# Altium PCB PCB1.PcbDoc
Units mm, origin at the board's own origin, x right, y up, seen from the top; angles counter-clockwise.
Board outline 100 x 68 mm, 2 copper layers (Top Layer, Bottom Layer); 53 components, 41 nets, 257 pads, 329 vias.
Unrouted connection lines stored in the file: 28.
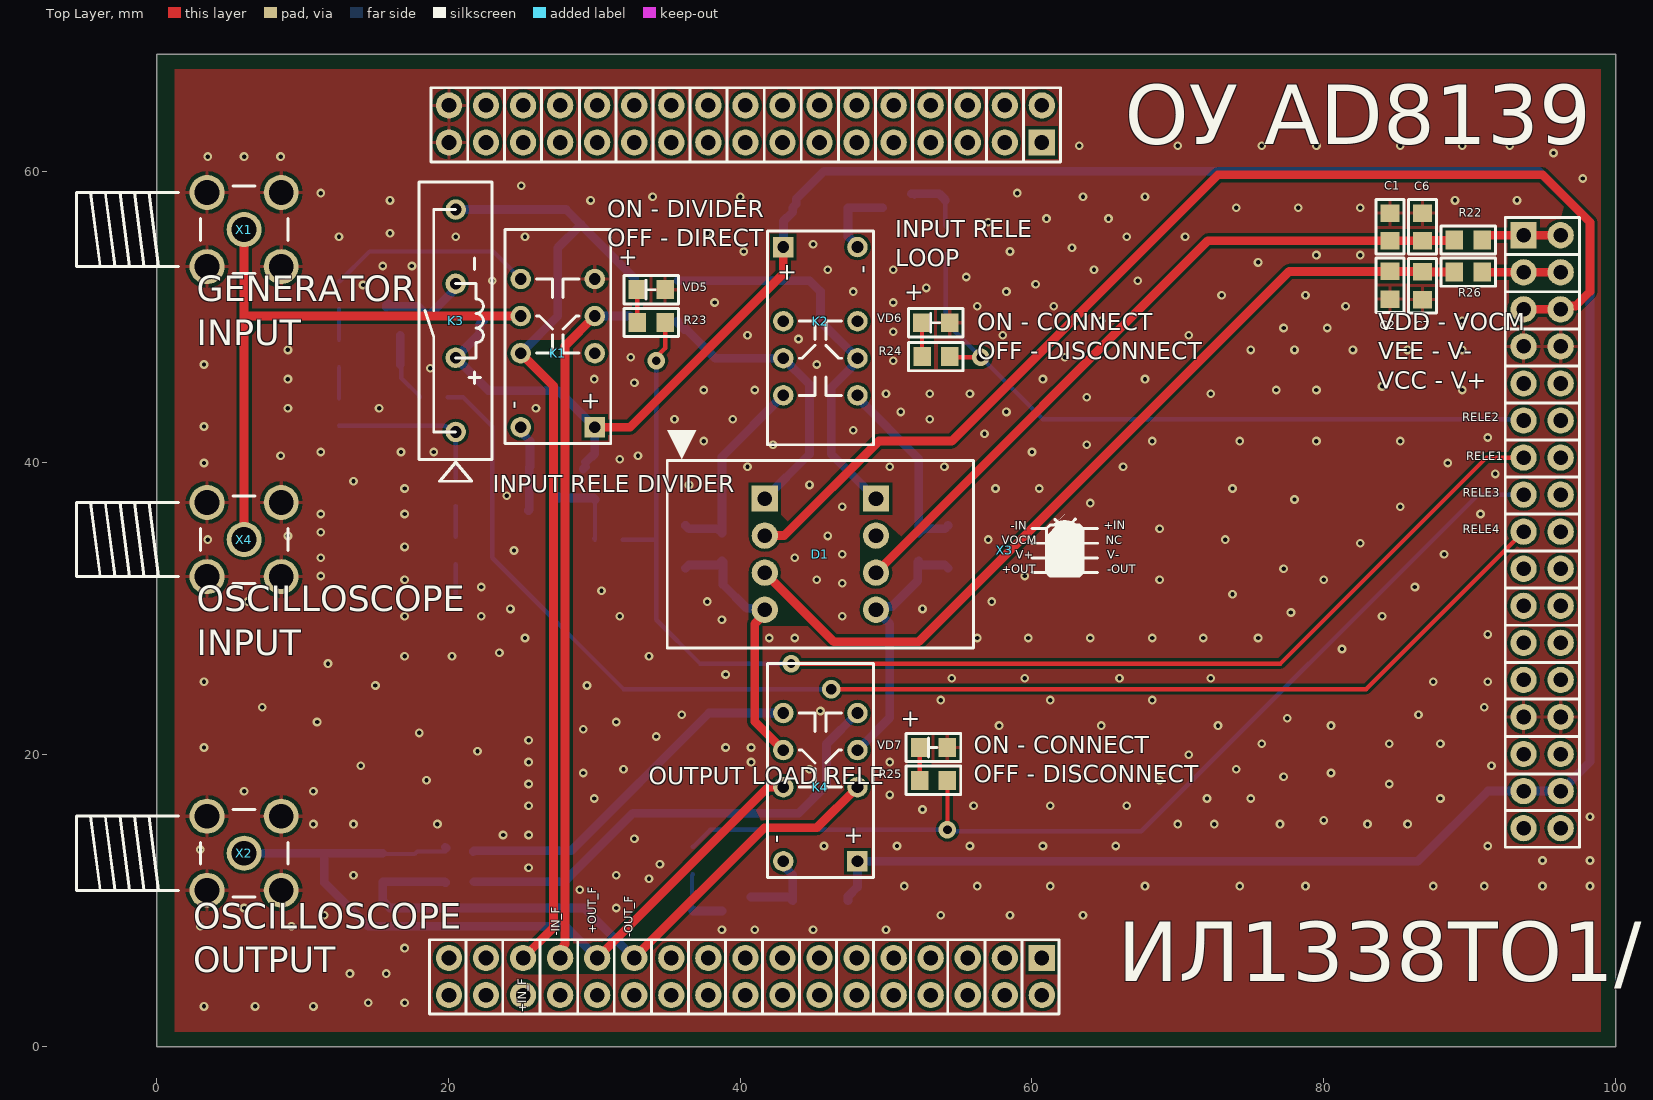
[diagram p0: Top Layer view]
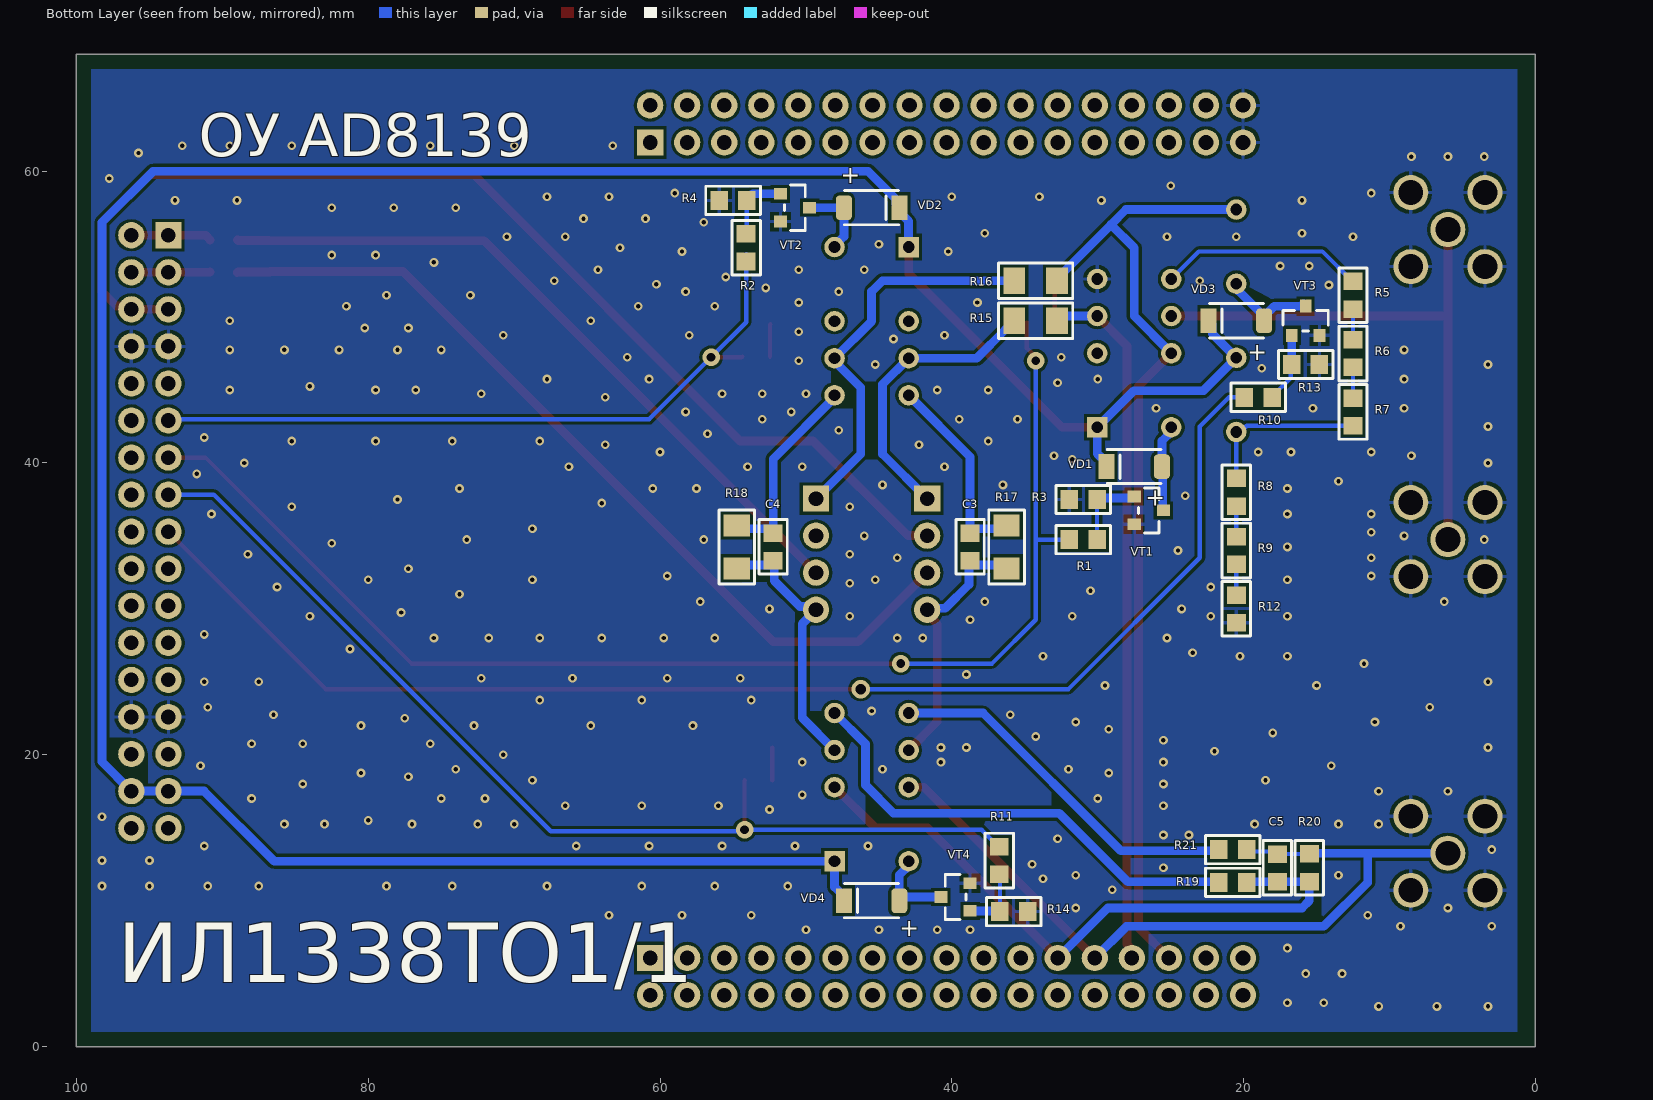
[diagram p1: Bottom Layer view, seen from below]

## Layer stack, top to bottom
Top Solder: solder mask 0.0102, Solder Resist, Dk 3.5
Top Layer: signal copper 0.0356
Dielectric 1: dielectric 0.32, FR-4, Dk 4.8
Bottom Layer: signal copper 0.0356
Bottom Solder: solder mask 0.0102, Solder Resist, Dk 3.5

## Board outline
0,0 100,0 100,68 0,68

## Design rules (kind name [scope] priority, off if disabled: settings)
Clearance [All] p1: gap=0.2 ignorepadtopadclearanceinfootprint=FALSE
ComponentClearance [All] p1: gap=0 collisioncheckmode=3 verticalgap=0 showdistances=FALSE
PolygonConnect [InNet('GND')] p1: thpad.connectstyle=Relief thpad.reliefconductorwidth=0.254 thpad.reliefentries=4 thpad.polygonreliefangle="90 Angle" thpad.airgapwidth=0.254 smdpad.connectstyle=Relief smdpad.reliefconductorwidth=0.254 smdpad.reliefentries=4 smdpad.polygonreliefangle="90 Angle" smdpad.airgapwidth=0.254 via.connectstyle=Direct via.reliefconductorwidth=0.254 via.reliefentries=4 via.polygonreliefangle="90 Angle" via.airgapwidth=0.254
RoutingVias [All] p1: holewidth=0.4 width=0.8 viastyle="Through Hole" minholewidth=0.3 minwidth=0.6 maxholewidth=0.8 maxwidth=1.6
SilkToSilkClearance [All] p1: silktosilkclearance=0
SilkToSolderMaskClearance [IsPad] p1: minsilkscreentomaskgap=0 clearancetoexposedcopper=TRUE
SolderMaskExpansion [All] p1: expansion=0.102 istentingtop=FALSE
Width [All] p1: maxlimit=0.6 minlimit=0.3 preferedwidth=0.3
27 further rules are at their usual default settings.

## Classes and differential pairs
component class "Formula connector": X3

## Components (designator, comment, footprint, x,y, rotation, side; value= is the part's Value field where it differs from the comment)
C1 "0.1uF" 0805 84.544,56.182 r90 top
C2 "0.1uF" 0805 84.544,52.183 r270 top
C3 "0.1uF" 0805 38.75,34.25 r270 bottom
C4 "0.1uF" 0805 52.25,34.25 r270 bottom
C5 "0.1uF" 0805 17.685,12.245 r270 bottom
C6 "0.1uF" 0805 86.768,56.182 r90 top
C7 "0.1uF" 0805 86.768,52.151 r270 top
D1 "AD8139" AD8139 45.5,33.75 r0 top
K1 "V23079A1001B301 TE" V23079A1001B301 27.5,48.75 r90 top
K2 "V23079A1001B301 TE" V23079A1001B301 45.5,48.5 r270 top
K3 "TRR1A05F00" TRR1A05F00 20.5,49.75 r90 top
K4 "V23079A1001B301 TE" V23079A1001B301 45.5,19 r90 top
R1 "4.7k" 0805 31,34.75 r180 bottom
R2 "4.7k" 0805 54.1,54.761 r90 bottom
R3 "20k" 0805 31,37.5 r0 bottom
R4 "20k" 0805 55,58 r0 bottom
R5 "R0805 Yageo" 0805 12.5,51.5 r270 bottom
R6 "R0805 Yageo" 0805 12.5,47.5 r270 bottom
R7 "R0805 Yageo" 0805 12.5,43.5 r270 bottom
R8 "R0805 Yageo" 0805 20.5,38 r90 bottom
R9 "R0805 Yageo" 0805 20.5,34 r90 bottom
R10 "4.7k" 0805 19,44.5 r180 bottom
R11 "4.7k" 0805 36.75,12.75 r270 bottom
R12 "R0805 Yageo" 0805 20.5,30 r90 bottom
R13 "20k" 0805 15.75,46.75 r180 bottom
R14 "20k" 0805 35.75,9.25 r180 bottom
R15 "R1206 Yageo 200 Ohm ±0.1%" 1206 34.25,49.75 r0 bottom
R16 "R1206 Yageo 200 Ohm ±0.1%" 1206 34.25,52.5 r0 bottom
R17 "R1206 Yageo 200 Ohm ±0.1%" 1206 36.25,34.25 r270 bottom
R18 "R1206 Yageo 200 Ohm ±0.1%" 1206 54.75,34.25 r270 bottom
R19 "R0805 Yageo" 0805 20.75,11.25 r180 bottom
R20 "R0805 Yageo" 0805 15.5,12.25 r270 bottom
R21 "R0805 Yageo" 0805 20.75,13.5 r180 bottom
R22 "2.2k" 0805 89.9,55.281 r0 top
R23 "2.2k" 0805 33.904,49.627 r180 top
R24 "2.2k" 0805 53.415,47.295 r180 top
R25 "2.2k" 0805 53.25,18.25 r180 top
R26 "2.2k" 0805 89.9,53.084 r0 top
VD1 "LL4148 NXP" SOD80C 27.5,39.75 r0 bottom
VD2 "LL4148 NXP" SOD80C 45.5,57.5 r180 bottom
VD3 "LL4148 NXP" SOD80C 20.5,49.75 r0 bottom
VD4 "LL4148 NXP" SOD80C 45.5,10 r0 bottom
VD5 "LED(0805)" 0805(LED) 33.904,51.877 r0 top
VD6 "LED(0805)" 0805(LED) 53.413,49.613 r0 top
VD7 "LED(0805)" 0805(LED) 53.25,20.5 r0 top
VT1 "MMBT5551L" SOT-23 26.5,36.75 r270 bottom
VT2 "MMBT5551L" SOT-23 50.75,57.5 r270 bottom
VT3 "MMBT5551L" SOT-23 15.75,49.75 r180 bottom
VT4 "MMBT5551L" SOT-23 39.75,10.25 r90 bottom
X1 "SMA GENERATOR" KLS1-SMA002-B 6,56 r90 top
X2 "SMA OSC" KLS1-SMA002-B 6,13.25 r90 top
X3 "FORMULA" FORMULA 48.5,32.75 r0 top locked
X4 "SMA OSC" KLS1-SMA002-B 6,34.75 r90 top

## Footprints (in the part's own frame and the unit in brackets; to place one, negate y for a bottom-side part, rotate by r counter-clockwise, add the part's x,y. Pads: shape width x height; smd on the part's side, far side on the other; paste and mask are expansions set on the pad)
0805 [mm]
  rect 1.2x1.3 smd: 1(-0.95,0) 2(0.95,0)
  silkscreen extent -1.87,-0.97 1.87,0.97, body extent -1.05,-0.63 0.95,0.63, height 0.55
0805(LED) [mm]
  rect 1.2x1.3 smd: 1(-0.95,0) 2(0.95,0)
  silkscreen extent -1.87,-0.97 1.87,0.97, body extent -1.03,-0.41 1.03,0.5, height 0.85
1206 [mm]
  rect 1.5x1.8 smd: 1(-1.47,0) 2(1.47,0)
  silkscreen extent -2.54,-1.22 2.54,1.22, body extent -1.81,-0.8 1.79,0.8, height 0.55
AD8139 [mm]
  rect 1.8x1.8 hole 1: 1(-3.81,3.81) 8(3.81,3.81)
  round 1.8 hole 1: 2(-3.81,1.27) 3(-3.81,-1.27) 4(-3.81,-3.81) 5(3.81,-3.81) 6(3.81,-1.27) 7(3.81,1.27)
  silkscreen extent -10.5,-6.42 10.5,6.43, body extent -5.06,-5.35 5.06,5.35, height 3
FORMULA [mm]
  rect 1.8x1.8 hole 1: 1(12.18,29.22) VDDF(12.18,-26.68) VEEF(45.2,22.86)
  round 1.8 hole 1: 2(9.64,29.22) 3(7.1,29.22) 4(4.56,29.22) 5(2.02,29.22) 6(-0.52,29.22) 7(-3.06,29.22) 8(-5.6,29.22) 9(-8.14,29.22) 10(-10.68,29.22) 11(-13.22,29.22) 12(-15.76,29.22) 13(-18.3,29.22) 14(-20.84,29.22) 15(-23.38,29.22) 16(-25.92,29.22) 17(12.18,31.76) 18(9.64,31.76) 19(7.1,31.76) 20(4.56,31.76) 21(2.02,31.76) 22(-0.52,31.76) 23(-3.06,31.76) 24(-5.6,31.76) 25(-8.14,31.76) 26(-10.68,31.76) 27(-13.22,31.76) 28(-15.76,31.76) 29(-18.3,31.76) 30(-20.84,31.76) 31(-23.38,31.76) 32(-25.92,31.76) 33(-28.46,-29.22) 34(-25.92,-29.22) 35(-23.38,-29.22) 36(-20.84,-29.22) 37(-18.3,-29.22) 38(-15.76,-29.22) 39(-13.22,-29.22) 40(-10.68,-29.22) 41(-8.14,-29.22) 42(-5.6,-29.22) 43(-3.06,-29.22) 44(-0.52,-29.22) 45(2.02,-29.22) 46(4.56,-29.22) 47(7.1,-29.22) 48(9.64,-29.22) 49(-28.46,-26.68) 50(-25.92,-26.68) 51(-23.38,-26.68) 52(-20.84,-26.68) 53(-18.3,-26.68) 54(-15.76,-26.68) 55(-13.22,-26.68) 56(-10.68,-26.68) 57(-8.14,-26.68) 58(-5.6,-26.68) 59(-3.06,-26.68) 60(-0.52,-26.68) 61(2.02,-26.68) 62(4.56,-26.68) 63(7.1,-26.68) 64(9.64,-26.68) +5V(45.2,-15.24) +5V(47.74,-15.24) +5V_VCCF(45.2,20.32) +5V_VCCS(47.74,20.32) +5V_VDDF(45.2,17.78) +5V_VDDS(47.74,17.78) +12V(45.2,-12.7) +12V(47.74,-12.7) -12V(45.2,-17.78) -12V(47.74,-17.78) GND(-28.46,29.22) GND(-28.46,31.76) GND(45.2,-10.16) GND(45.2,15.24) GND(47.74,-10.16) GND(47.74,15.24) IN-OUT1(47.74,10.16) IN-OUT2(47.74,7.62) IN-OUT3(47.74,5.08) IN-OUT4(47.74,2.54) IN-OUT5(47.74,0) IN-OUT6(47.74,-2.54) IN-OUT7(47.74,-5.08) IN-OUT8(47.74,-7.62) NC(45.2,12.7) NC(47.74,12.7) OUT1(45.2,10.16) OUT2(45.2,7.62) OUT3(45.2,5.08) OUT4(45.2,2.54) OUT5(45.2,0) OUT6(45.2,-2.54) OUT7(45.2,-5.08) OUT8(45.2,-7.62) VDDS(12.18,-29.22) VEES(47.74,22.86)
  silkscreen extent -29.8,-30.51 49.02,32.97, body extent -29.79,-30.4 48.98,32.92, height 3
KLS1-SMA002-B [mm]
  round 2.4 hole 1.7: 1(0,0) 2(-2.54,-2.54) 2(-2.54,2.54) 2(2.54,-2.54) 2(2.54,2.54)
  silkscreen extent -3,-3 3,11.49, body extent -3.5,-3.5 3.5,11.65, height 10
SOD80C [mm]
  rrect50% 1.1x1.7 smd: 1(-1.9,0)
  rect 1.1x1.7 smd: 2(1.9,0)
  silkscreen extent -1.85,-1.17 1.85,1.17, body extent -1.9,-0.8 1.8,0.8, height 1.55
SOT-23 [mm]
  rect 0.8x0.9 smd: 1(-0.95,-1) 1(-0.95,-1) 2(0.95,-1) 2(0.95,-1) 3(0,1) 3(0,1)
  silkscreen extent -1.55,-0.72 1.55,0.7, body extent -1.5,-1.25 1.5,1.25, height 1.05
TRR1A05F00 [mm]
  round 1.4 hole 0.8: 1(-7.62,0) 3(-2.54,0) 5(2.54,0) 7(7.62,0)
  silkscreen extent -11,-2.5 9.5,2.5, body extent -9.47,-2.64 9.53,2.39, height 7.64
V23079A1001B301 [mm]
  rect 1.4x1.4 hole 0.8: 1(-6.3,-2.54)
  round 1.4 hole 0.8: 3(-1.22,-2.54) 4(1.32,-2.54) 5(3.86,-2.54) 8(3.86,2.54) 9(1.32,2.54) 10(-1.22,2.54) 12(-6.3,2.54)
  silkscreen extent -7.4,-3.63 7.25,3.63, body extent -7.25,-3.6 7.25,3.6, height 9.4

## Part data
C1 C2 C3 C4 C5 C6 C7: library part C0805, ComponentHeigt=1.3, Firme=AVX, KIND=Конденсатор, Leadform=SMD, Packaging=0805
R1 R2 R3 R4 R10 R11 R13 R14 R22 R23 R24 R25 R26: library part "R0805 Yageo", ComponentHeigt=0.6, Firme=Yageo, KIND=Резистор, Leadform=SMD, Packaging=0805
R15 R16 R17 R18: library part "R1206 Yageo", ComponentHeigt=0.6, Firme=Yageo, KIND=Резистор, Leadform=SMD, Packaging=0805
X1 X2 X4: library part KLS1-SMA002-B, ComponentHeigt=5.5, Name=Вилка, Specification="Вилка PLD2-2 *", Typ=PLD2-2
R5 R6 R7 R8 R9 R12 R19 R20 R21: ComponentHeigt=0.6, Firme=Yageo, KIND=Резистор, Leadform=SMD, Packaging=0805
VD1 VD2 VD3 VD4: Component Link=http://www.nxp.com, ComponentHeigt=1.6, Firme=NXP, KIND="Диод LL4148 NXP", Leadform=SMD, NN=24009301, Packaging=SOD-80C
VD5 VD6 VD7: ComponentHeigt=0.75, Firme=Kingbright, KIND="Светодиод L-1154GD Kingbright", Leadform="в отверстия", NN=24003000
VT1 VT2 VT3 VT4: ComponentHeigt=1.1, Firme=ONS, KIND="Транзистор MMBT5551L*G ONS", Leadform=SMD, NN=24007468, Packaging=SOT-23

## Via types
v1: diameter 0.6, hole 0.3, Top Layer to Bottom Layer, tented both sides, 324 vias
v2: diameter 1.2, hole 0.6, Top Layer to Bottom Layer, tented both sides, 4 vias
v3: diameter 1.27, hole 0.711, Top Layer to Bottom Layer, tented both sides, 1 vias

## Nets (pads, with @x,y where several pads share a name; then routed paths per layer and width w, separated by ;. In a path a pad name is that pad's centre, name@x,y a point inside that pad or via, vN(x,y) a via of type N, cw(c..) or ccw(c..) an arc to the next point about the centre after c; other vN are vias at no path point)
+5V_CONST: K1.1 K2.1 K3.3 K4.1 VD1.2 VD2.2 VD3.2 VD4.2 X3.+5V | length 190.1
  Top Layer w0.6: K1.1 32.45,42.45 42.96,52.96 K2.1
  Bottom Layer w0.6: VD3.2 22.15,49.5 22.15,48.86 K3.3 22.757,44.953 27.537,44.953 K1.1 30.04,40.626 29.864,40.45 29.8,40.45 VD1.2@29.4,40.05 ; VD1.2@29.241,39.591 VD1.2 ; K2.1@42.964,54.894 42.964,56.564 43.6,57.2 VD2.2 43.85,57.75 43.85,58.1 45.75,60 94.75,60 98.25,56.5 98.25,19.52 96.24,17.51 93.7,17.51 91.26,17.51 86.45,12.7 K4.1@48.044,12.7 ; VD4.2 47.4,10.3 48.044,10.944 K4.1@48.044,12.7 ; K4.1 K4.1@48.044,12.7
+5V_VCC: R26.2 X3.+5V_VCCF X3.+5V_VCCS | length 5.4
  Top Layer w0.6: R26.2 90.857,53.077 93.693,53.077 X3.+5V_VCCF X3.+5V_VCCS
+5V_VEE: R22.2 X3.VEEF X3.VEES | length 5.5
  Top Layer w0.6: R22.2 90.85,55.31 91.15,55.61 X3.VEES
+IN: K1.10 K3.7 R16.1 X3.51 | length 68.2
  Top Layer w0.6: K1.10 27.2,45.29 27.2,8.15 X3.51
  Bottom Layer w0.6: K3.7 28.06,57.37 29.09,56.34 ; K1.10 27.5,50.07 27.5,54.75 29.09,56.34 ; R16.1 32.78,52.65 29.09,56.34
+IN_OP: D1.8 K2.9 R16.2 | length 27.3
  Bottom Layer w0.6: R16.2 44.75,52.5 45.5,51.75 45.5,49.72 K2.9 48.04,46.964 46.25,45.174 46.25,40.62 D1.8
+IN_SMA: K1.9 X1.1 X4.1 | length 40.3
  Top Layer w0.6: X4.1@6,34.625 X1.1 ; 6,50.07 K1.9
+OUT: C3.2 D1.4 K4.9 R17.2 | length 18.7
  Top Layer w0.6: D1.4 41.69,29.679 41,28.989 41,22.28 K4.9
  Bottom Layer w0.6: R17.2 36.47,33 38.45,33 C3.2 38.824,33.226 38.824,31.676 40.452,30.048 41.582,30.048 D1.4
+OUT_F: C5.1 K4.10 R20.1 R21.2 X2.1 X3.53 | length 54.5
  Top Layer w0.6: X3.53 41.904,17.774 42.954,17.774 K4.10
  Bottom Layer w0.3: R20.1@15.5,13.25 R20.1 C5.1@17.685,13.2 ; C5.1 17.859,13.368 R21.2@19.806,13.368
  Bottom Layer w0.6: X2.1 11.5,13.25 ; R20.1@15.5,13.25 11.5,13.25 ; R21.2@19.78,13.668 R21.2@19.83,13.618 ; X3.53 28.02,8.25 14.5,8.25 11.5,11.25 11.5,13.25
-IN: K1.4 R15.1 X3.52 | length 48
  Top Layer w0.6: X3.52@27.632,6.098 27.89,6.355 27.89,6.911 28,7.021 28,48.03 K1.4
  Bottom Layer w0.6: X3.52 X3.52@27.75,6.16 ; K1.4 32.46,50.07 R15.1
-IN_OP: D1.1 K2.4 R15.2 | length 20.2
  Bottom Layer w0.6: R15.2@35.645,49.675 R15.2 35.72,49.6 36.17,49.15 36.32,49.15 38.29,47.18 K2.4 44.75,45.39 44.75,40.62 D1.1 ; K2.4@42.635,47.105 K2.4@42.71,47.18
-OUT: C4.2 D1.5 K4.4 R18.2 | length 18.1
  Bottom Layer w0.6: K4.4 50.25,22.53 50.25,28.989 49.31,29.929 D1.5 49.54,30.17 50.42,30.17 52.176,31.926 52.176,33.226 C4.2 ; C4.2@52.25,33 54.03,33 R18.2@54.25,32.78
-OUT_F: C5.2 K4.3 R19.2 R20.2 X3.54 | length 44.7
  Top Layer w0.6: X3.54@32.75,6.08 41.67,15 45.26,15 K4.3
  Bottom Layer w0.6: C5.2 19.755,11.295 R19.2 ; C5.2@17.75,11.3 R20.2 15.5,10 16,9.5 29.31,9.5 X3.54 X3.54@32.75,6.08
GND: C1.2 C2.2 C6.2 C7.2 K1.5 R3.2 R4.2 R12.1 R13.2 R14.2 VD5.2 VD6.2 VD7.2 VT1.2 VT2.2 VT3.2 VT4.2 X1.2 X2.2 X3.GND X4.2
  other v1: 3.25,2.75 6.75,2.75 10.75,2.75 14.5,3 17,3 13.25,5 15.75,5 17,6.75 38.75,8 41,8 45,8 50,8 3,8.25 9.25,8.25 11.5,9 53.75,9 58.5,9 63.5,9 6,9.5 31.5,9.5 29,10.75 51.25,11 56.25,11 61.25,11 67.75,11 74.25,11 78.75,11 87.5,11 91,11 95,11 98.25,11 33.75,11.5 13.5,11.75 31.5,11.75 25.5,12.25 34.5,12.5 95,12.75 98.25,12.75 3,13.5 45.75,13.75 50.75,13.75 55.75,13.75 60.75,13.75 65.75,13.75 91.25,13.75 32.75,14.25 23.75,14.5 25.5,14.5 10.75,15.25 13.5,15.25 19.25,15.25 70,15.25 72.5,15.25 77,15.25 83,15.25 85.75,15.25 80,15.5 98.25,15.75 52.5,16.25 25.5,16.5 56,16.5 61.25,16.5 66.5,16.5 30,17 72,17 75,17 88,17 50.25,17.25 6,17.5 10.75,17.5 25.5,18 84.5,18 18.5,18.25 68.75,18.25 77.25,18.5 29.25,18.75 80.5,18.75 32,19 44.75,19 74,19 14,19.25 91.5,19.25 25.5,19.5 40.75,19.5 50.25,19.5 70.75,20 22,20.25 3.25,20.5 39,20.5 40.75,20.5 75.75,20.75 84.5,20.75 88,20.75 25.5,21 34.25,21.25 18,21.5 29.25,21.75 57.75,22 64.75,22 72.75,22 80.5,22 11,22.25 31.5,22.25 77.5,22.5 36,22.75 86.5,22.75 45.5,23 7.25,23.25 91,23.25 53.75,23.75 61.25,23.75 68.25,23.75 15,24.75 29.5,24.75 3.25,25 87.5,25 91.25,25 54.5,25.25 59.5,25.25 66,25.25 72.25,25.25 39,25.5 11.75,26.25 17,26.75 20.25,26.75 33.75,26.75 23.5,27 81.25,27.25 25.25,28 42,28 43.75,28 56.25,28 59.75,28 64,28 68.25,28 71.75,28 75.5,28 91.25,28.25 38.75,29.25 17,29.5 22.25,29.5 31.75,29.5 47,29.5 84,29.5 77.75,29.75 24.25,30 52.5,30 6.25,30.5 37.75,30.5 57.25,30.5 73.75,31 30.5,31.25 22.25,31.5 86.25,31.5 47,31.75 17,32 45.25,32 68.75,32 80,32 11.25,32.25 59.5,32.25 77.25,32.75 11.25,33.5 43.75,33.5 47,33.75 88.25,33.75 24.5,34 17,34.25 82.5,34.5 3.5,34.75 57,34.75 73.25,34.75 9,35 46,35 11.25,35.25 68.75,35.5 11.25,36.5 17,36.5 90.75,36.5 47,37 85.25,37 64,37.25 78,37.5 24,37.75 17,38.25 57.5,38.25 60.5,38.25 73.75,38.25 36.5,38.5 44.75,38.5 13.5,38.75 91.75,39.25 40.5,39.75 50.25,39.75 54,39.75 66.25,39.75 3.25,40 88.5,40 31.75,40.25 8.5,40.5 33,40.5 11.25,40.75 16.75,40.75 19,40.75 60,40.75 42.25,41.25 63.75,41.25 37.5,41.5 68.25,41.5 74.25,41.5 79.5,41.5 85.25,41.5 91.25,41.75 56.75,42 47.75,42.25 3.25,42.5 35.5,43 39.5,43 53,43 51,43.5 58.25,43.5 9,43.75 15.25,43.75 26,43.75 63.75,44.5 50,44.75 53,44.75 55.75,44.75 72.25,44.75 37.5,45 41,45 76.75,45 79.5,45 89.5,45 84,45.25 32.75,45.5 9,45.75 30,45.75 60.75,45.75 67.75,45.75 18.75,46.5 3.25,46.75 45.25,46.75 50.5,47 32.5,47.25 62.25,47.25 9,47.75 75,47.75 78,47.75 82,47.75 85.75,47.75 89.5,47.75 44,48.5 40.5,48.75 58,48.75 70.75,48.75 50.5,49 77.25,49.25 80.25,49.25 64.75,49.75 89.5,49.75 56.25,50.75 61.5,50.75 81.5,50.75 38.25,51 50.5,51 73,51.5 78.75,51.5 47.75,51.75 58.25,51.75 52.75,52 14.155,52.199 60.25,52.25 23,52.5 67.25,52.5 55.5,52.75 46,53.25 50.5,53.25 64.25,53.25 15.5,53.5 17.5,53.5 75.5,53.75 79.5,54.25 82.5,54.25 40.25,54.5 58.5,54.5 62.75,54.75 45,55 12.5,55.5 20.5,55.5 25.25,55.5 66.5,55.5 70.5,55.5 16,55.75 37.75,55.75 57,56.5 61,56.75 65.25,56.75 74,57.5 78.25,57.5 82.5,57.5 16,58 29.75,58 89,58 93.25,58 34,58.25 40,58.25 63.5,58.25 67.75,58.25 11.25,58.5 59,58.5 25,59 97.75,59.5 3.5,61 6,61 8.5,61 95.75,61.25 63.25,61.75 70,61.75 75.75,61.75 79.5,61.75 85.25,61.75 89.5,61.75 92.75,61.75
NetC3_1: C3.1 K2.5 R17.1 | length 13.9
  Bottom Layer w0.6: R17.1 36.47,35.5 38.45,35.5 C3.1 38.75,40.43 K2.5
NetC4_1: C4.1 K2.8 R18.1 | length 13.4
  Bottom Layer w0.6: K2.8@47.964,44.564 52.25,40.278 52.25,35.5 C4.1 52.55,35.5 54.03,35.5 R18.1@54.25,35.72
NetK1_8: K1.8 R5.1 | length 14.1
  Bottom Layer w0.3: R5.1 12.55,52.45 14.6,54.5 23.07,54.5 K1.8
NetK1_12: K1.12 VD1.1 VT1.3 | length 6
  Bottom Layer w0.6: K1.12 24.96,42.152 25.6,41.512 VD1.1 25.55,39.7 25.55,36.8 VT1.3@25.5,36.75
NetK2_12: K2.12 VD2.1 VT2.3 | length 5.3
  Bottom Layer w0.6: K2.12 48.04,54.886 47.4,55.526 VD2.1 VT2.3@49.75,57.5
NetK3_1: K3.1 R7.2 R8.2 | length 11.4
  Bottom Layer w0.3: R7.2 19.782,42.55 20.202,42.13 K3.1 R8.2
NetK3_5: K3.5 VD3.1 VT3.3 | length 6.5
  Bottom Layer w0.6: VT3.3@15.75,50.7 15.75,50.8 15.85,50.9 VT3.3@15.9,50.9 ; VT3.3@15.75,50.75 17.9,50.75 18.6,50.05 20.347,51.797 20.347,52.137 K3.5
NetK4_5: K4.5 R19.1 | length 32.7
  Bottom Layer w0.6: R19.1@21.749,11.3 27.941,11.3 32.641,16 44,16 45.91,17.91 45.91,20.73 K4.5
NetK4_8: K4.8 R21.1 | length 25.2
  Bottom Layer w0.6: R21.1@21.706,13.368 21.756,13.418 28.418,13.418 37.86,22.86 K4.8
NetK4_12: K4.12 VD4.1 VT4.3 | length 5.9
  Bottom Layer w0.6: VT4.3@40.75,10.25 43.35,10.25 VD4.1 43.6,11.762 42.96,12.402 K4.12
NetR1_2: R1.2 R3.1 VT1.1 | length 5.5
  Bottom Layer w0.3: R1.2@30,34.8 R1.2 R3.1
  Bottom Layer w0.6: VT1.1@27.5,37.7 27.6,37.6 29.95,37.6 R3.1
NetR2_2: R2.2 R4.1 VT2.1 | length 4.6
  Bottom Layer w0.3: VT2.1@51.75,58.45 VT2.1@51.95,58.25 ; R4.1 54.05,56.261 R2.2@54.1,56.211
  Bottom Layer w0.6: VT2.1@51.75,58.45 53.65,58.45 54.05,58.05 R4.1
NetR5_2: R5.2 R6.1 | length 2.1
  Bottom Layer w0.3: R6.1 R5.2
NetR6_2: R6.2 R7.1 | length 2.1
  Bottom Layer w0.3: R7.1 R6.2
NetR8_1: R8.1 R9.2 | length 2.1
  Bottom Layer w0.3: R9.2 R8.1
NetR9_1: R9.1 R12.2 | length 2.1
  Bottom Layer w0.3: R12.2 R9.1
NetR10_2: R10.2 R13.1 VT3.1 | length 4.8
  Bottom Layer w0.3: R13.1 16.774,46.676 16.774,45.826 18.05,44.55 R10.2
  Bottom Layer w0.6: R13.1 VT3.1@16.7,48.75
NetR11_2: R11.2 R14.1 VT4.1 | length 4.6
  Bottom Layer w0.3: R14.1@36.75,9.3 R14.1 36.7,11.75 R11.2
  Bottom Layer w0.6: R14.1@36.75,9.3 VT4.1@38.75,9.3
NetR23_2: R23.2 VD5.1 | length 2.2
  Top Layer w0.3: R23.2 VD5.1
NetR24_2: R24.2 VD6.1 | length 2.2
  Top Layer w0.3: VD6.1@52.45,49.5 52.465,49.485 R24.2
NetR25_2: R25.2 VD7.1 | length 2.2
  Top Layer w0.3: R25.2 VD7.1
RELE1: R1.1 R23.1 X3.OUT2 | length 89.5
  Top Layer w0.3: v2(34.25,47) 34.25,47.262 34.854,47.866 R23.1 ; v2(43.5,26.25) 77.04,26.25 91.16,40.37 X3.OUT2
  Bottom Layer w0.3: R1.1 34.25,34.75 ; v2(34.25,47) 34.25,34.75 ; v2(43.5,26.25) 37.25,26.25 34.25,29.25 34.25,34.75
RELE2: R2.1 R24.1 X3.OUT1 | length 49.2
  Top Layer w0.3: R24.1 54.41,47.25 v2(56.5,47.25)
  Bottom Layer w0.3: R2.1@54.1,54.311 54.1,49.65 v2(56.5,47.25) 60.75,43 X3.OUT1@93.7,43
RELE3: R11.1 R25.1 X3.OUT3 | length 70.4
  Top Layer w0.3: R25.1 54.211,18.239 v2(54.211,14.862)
  Bottom Layer w0.3: R11.1 36.8,13.7 37.962,14.862 v2(54.211,14.862) 54.323,14.75 67.5,14.75 90.58,37.83 X3.OUT3
RELE4: R10.1 X3.OUT4 | length 91.8
  Top Layer w0.3: v3(46.25,24.5) 82.91,24.5 X3.OUT4
  Bottom Layer w0.3: R10.1 21,44.5 23,42.5 23,33.5 32,24.5 v3(46.25,24.5)
V+: C2.1 C7.1 D1.3 R26.1 | length 59.8
  Top Layer w0.6: D1.3 46.42,27.75 52.25,27.75 77.633,53.133 C2.1 84.56,53.117 86.752,53.117 C7.1 86.777,53.093 88.942,53.093 R26.1 R26.1@88.975,53.059
V-: C1.1 C6.1 D1.6 R22.1 | length 49.1
  Top Layer w0.6: D1.6 72.062,55.232 C1.1 C6.1 86.793,55.257 88.926,55.257 R22.1 R22.1@88.975,55.306
VOCM: D1.2 X3.+5V_VDDF X3.+5V_VDDS | length 78
  Top Layer w0.6: D1.2 41.698,35.028 43.028,35.028 49.5,41.5 54.5,41.5 72.75,59.75 95,59.75 98.25,56.5 98.25,51.75 97.26,50.76 96.47,50.76 X3.+5V_VDDS 95.68,50.53 X3.+5V_VDDF
pads on no net: D1.7 K1.3 K2.3 K2.10 X3.1 X3.2 X3.3 X3.4 X3.5 X3.6 X3.7 X3.8 X3.9 X3.10 X3.11 X3.12 X3.13 X3.14 X3.15 X3.16 X3.17 X3.18 X3.19 X3.20 X3.21 X3.22 X3.23 X3.24 X3.25 X3.26 X3.27 X3.28 X3.29 X3.30 X3.31 X3.32 X3.33 X3.34 X3.35 X3.36 X3.37 X3.38 X3.39 X3.40 X3.41 X3.42 X3.43 X3.44 X3.45 X3.46 X3.47 X3.48 X3.49 X3.50 X3.55 X3.56 X3.57 X3.58 X3.59 X3.60 X3.61 X3.62 X3.63 X3.64 X3.+12V X3.-12V X3.IN-OUT1 X3.IN-OUT2 X3.IN-OUT3 X3.IN-OUT4 X3.IN-OUT5 X3.IN-OUT6 X3.IN-OUT7 X3.IN-OUT8 X3.NC X3.OUT5 X3.OUT6 X3.OUT7 X3.OUT8 X3.VDDF X3.VDDS

## Polygon pours and split planes (outlines as drawn)
GND on Top Layer "NONET_L-01_P-001" (solid, remove dead copper, pour order 0): 1.25,67 1.25,1 99,1 99,67
GND on Bottom Layer "NONET_L-01_P-001" (solid, remove dead copper, pour order 1): 1.25,67 1.25,1 99,1 99,67

## Other copper
Top Layer:
  pour cut-out: 41.67,15 40.75,15 40.75,16.75
  pour cut-out: 33.754,50.477 33.754,48.777 34.054,48.777 34.054,50.477
  pour cut-out: 24.725,48.407 28,48.407 28,46.75
  pour cut-out: 55.165,46.445 56.5,46.445 56.5,46.443
  pour cut-out: 55.165,48.145 55.165,48.057 56.5,48.057
  pour cut-out: 92.718,52.567 92.718,50.53 93.7,50.53
  pour cut-out: 92.6,54.51 92.6,53.07 93.7,53.07 93.7,55.61
  pour cut-out: 96.24,56.719 96.24,51 96.625,51 96.625,58.125
  pour cut-out: 83.694,56.032 83.694,54.432 87.618,54.432 87.618,56.032
  pour cut-out: 83.694,52.333 83.694,53.901 87.618,53.901 87.618,52.301
  pour cut-out: 89.75,53.934 89.75,52.234 90.05,52.234 90.05,53.934
  pour cut-out: 89.75,56.131 89.75,54.431 90.05,54.431 90.05,56.131
  pour cut-out: 40.581,32.48 40.581,28.831 45.942,28.831
  pour cut-out: 50.095,35.805 50.095,34.5 51.5,34.5
  pour cut-out: 48.238,35.307 48.238,32.48 49.31,32.48
  pour cut-out: 42.5,36.75 42.5,35.5 43.75,35.5
  pour cut-out: 40.59,37.143 40.59,35.028 42.226,35.028
  pour cut-out: 6.5,48.75 6.5,49.525 7.215,49.525
  pour cut-out: 53.263,50.463 53.263,46.445 51.663,46.445 51.663,50.463
  pour cut-out: 53.1,21.35 53.1,18.25 52.3,18.25
  pour cut-out: 51.5,20.448 51.5,18.75 52.443,18.75
  pour cut-out: 53.1,19.1 53.1,17.4 53.4,17.4 53.4,19.1
  pour cut-out: 30.71,7.049 32.75,7.049 32.75,6.08
  pour cut-out: 28.471,6.826 28.471,7.049 29.69,7.049
  pour cut-out: 27.775,4.976 32.75,4.976 32.75,6.08
  pour cut-out: 25.12,4.961 27.775,4.961 27.775,6.185
Bottom Layer:
  pour cut-out: 18.095,51.221 19.623,51.221 19.623,52.055
  pour cut-out: 45.91,17.91 45.91,14.75 44.25,14.75
  pour cut-out: 37.5,16 37.962,16 37.962,14.862
  pour cut-out: 33.139,18.139 33.139,15.5 31.75,15.5
  pour cut-out: 30.85,35.6 31.15,35.6 31.15,33.9 30.85,33.9
  pour cut-out: 19.65,34.15 21.35,34.15 21.35,33.85 19.65,33.85
  pour cut-out: 19.65,38.15 21.35,38.15 21.35,37.85 19.65,37.85
  pour cut-out: 18.85,45.35 19.15,45.35 19.15,43.65 18.85,43.65
  pour cut-out: 11.65,43.65 13.35,43.65 13.35,43.35 11.65,43.35
  pour cut-out: 11.65,47.65 13.35,47.65 13.35,47.35 11.65,47.35
  pour cut-out: 11.65,51.65 13.35,51.65 13.35,51.35 11.65,51.35
  pour cut-out: 37.9,34.4 39.6,34.4 39.6,34.1 37.9,34.1
  pour cut-out: 50.721,29.184 50.721,30.17 49.54,30.17
  pour cut-out: 27.66,4.961 30.2,4.961 30.2,6.07
  pour cut-out: 26.551,6.07 26.551,8.25 28.02,8.25
  pour cut-out: 96.24,21.159 98.25,21.159 98.25,19.52
  pour cut-out: 95.131,20.05 95.131,17.51 96.24,17.51
  pour cut-out: 16.35,10.943 16.35,10.495 16.835,10.495 16.835,10.943
  pour cut-out: 16.35,14 16.35,13.557 16.835,13.557 16.835,13.995
  pour cut-out: 16.35,14 16.35,13.995 16.35,13.557
  pour cut-out: 18.182,13.725 19,13.725 19,14.35
  pour cut-out: 19,10.4 19,10.495 18.535,10.495
  pour cut-out: 20.6,10.4 20.6,12.1 20.9,12.1 20.9,10.4
  pour cut-out: 20.6,14.35 20.6,12.74 20.9,12.74 20.9,14.35
  pour cut-out: 14.65,12.74 22.5,12.74 22.5,12.1 14.65,12.1
  pour cut-out: 30.2,4.961 32.74,4.961 32.74,6.07
  pour cut-out: 14.65,10.97 14.65,8.25 15.98,8.25
  pour cut-out: 35.9,12.9 35.9,12.6 37.6,12.6 37.6,12.9
  pour cut-out: 50.416,22.991 48.04,22.991 48.04,22.279
  pour cut-out: 46.68,21.5 47.398,21.5 47.398,19.678
  pour cut-out: 27.75,13.25 27.75,11.5 28.625,11.5
  pour cut-out: 53.65,33.51 53.1,33.51 53.1,34.99 53.65,34.99
  pour cut-out: 54.44,31.83 52.25,31.83 52.25,33.66
  pour cut-out: 51.4,34.4 53.1,34.4 53.1,34.1 51.4,34.1
  pour cut-out: 48.275,46.543 48.275,43.75 46.333,43.75
  pour cut-out: 54.95,56.511 54.764,56.511 54.764,57.701
  pour cut-out: 54.85,57.15 53.25,57.15 53.25,56.511 54.678,56.511
  pour cut-out: 53.25,57.15 53.25,53.011 54.95,53.011 54.95,56.511 54.407,56.511
  pour cut-out: 44.551,45.585 46.033,45.585 46.033,45.472
  pour cut-out: 45.11,40.26 46,40.26 46,41

## Silkscreen, mask and mechanical layers (free items; w line width, h text height)
Top Overlay:
  region: 61.5,35.75 cw(c62.104,35.146) 62.104,36 62.396,36 cw(c62.396,35.146) 63,35.75
  region: 35,42.25 37,42.25 36,40.25
  region: 35,42.25 35.75,42.25 36.5,42.25
  region: 61.5,35.75 62.25,36.5
  region: 61,32.5 61,35 61.75,35.75 63.25,35.75 63.5,35.5 63.5,32.5 63.25,32.25 61.25,32.25
  lines w0.2: 60,32.5 61,32.5 ; 60,33.5 61,33.5 ; 60,34.5 61,34.5 ; 60,35.5 61,35.5 ; 61.5,35.75 cw(c62.25,34.75) 63,35.75 ; 61.57,36.143 61.767,35.947 ; 62.785,35.958 62.999,36.172 ; 63.5,33.5 64.5,33.5 ; 63.5,34.5 64.5,34.5 ; 64.5,32.5 63.5,32.5 ; 64.5,35.5 63.5,35.5 ; 61,32.5 61,35.5 ; 61,32.5 61.063,32.438 61.188,32.313 61.25,32.25 63.25,32.25 63.5,32.5 ; 61,35.5 61.25,35.75 63.25,35.75 63.5,35.5 ; 63.5,32.5 63.5,35.5
  text "ОУ AD8139" at 66.375,60.5 h7
  text "ON - DIVIDER / OFF - DIRECT" at 30.896,54.44 h2
  text "INPUT RELE / LOOP" at 50.628,53.079 h2
  text "GENERATOR / INPUT" at 2.75,47.494 h3
  text "ON - CONNECT / OFF - DISCONNECT" at 56.25,46.69 h2
  text "VDD - VOCM / VEE - V- / VCC - V+" at 83.75,44.69 h2
  text "RELE2" at 89.495,42.657 h1
  text "RELE1" at 89.778,39.984 h1
  text "INPUT RELE DIVIDER" at 23.058,37.583 h2
  text "RELE3" at 89.528,37.484 h1
  text "+IN" at 64.925,35.239 h1
  text "-IN" at 58.535,35.234 h1
  text "RELE4" at 89.528,34.984 h1
  text "VOCM" at 57.925,34.234 h1
  text "NC" at 65.062,34.234 h1
  text "V+" at 58.892,33.234 h1
  text "V-" at 65.179,33.234 h1
  text "+OUT" at 57.917,32.234 h1
  text "-OUT" at 65.162,32.234 h1
  text "OSCILLOSCOPE / INPUT" at 2.75,26.244 h3
  text "ON - CONNECT / OFF - DISCONNECT" at 56,17.69 h2
  text "OUTPUT LOAD RELE" at 33.728,17.579 h2
  text "+OUT_F" at 30.343,7.749 h1 r90
  text "-IN_F" at 27.843,7.587 h1 r90
  text "-OUT_F" at 32.843,7.495 h1 r90
  text "OSCILLOSCOPE / OUTPUT" at 2.5,4.494 h3
  text "ИЛ1338ТО1/1" at 65.875,3.137 h7
  text "+IN_F" at 25.532,2.32 h1 r90
Bottom Overlay:
  text "ОУ AD8139" at 91.604,60.073 h5
  text "ИЛ1338ТО1/1" at 97.188,3.069 h7
Board:
  the board outline again, w0.2

## Dimensions
100,68 to 100,0 on Mechanical 13
0,68 to 100,68 on Mechanical 13

## Text inside footprints (layer, text, board x,y; h text height)
K1: Top Overlay "-" at 25.39,43.68 h2 r90; Top Overlay "+" at 30.7,43.53 h2 r90
K2: Top Overlay "+" at 42.3,53.72 h2 r270; Top Overlay "-" at 47.61,53.57 h2 r270
K4: Top Overlay "-" at 43.39,13.93 h2 r90; Top Overlay "+" at 48.7,13.78 h2 r90
VD1: Bottom Overlay "+" at 25.385,38.498 h2 r180
VD2: Bottom Overlay "+" at 47.615,58.752 h2
VD3: Bottom Overlay "+" at 18.385,48.498 h2 r180
VD4: Bottom Overlay "+" at 42.25,9 h2 r180
VD5: Top Overlay "+" at 31.654,53.127 h2
VD6: Top Overlay "+" at 51.25,50.75 h2
VD7: Top Overlay "+" at 51,21.5 h2